# Altium PCB FullSheetOLD.PcbDoc (part 2 of 8)
Units mm, origin at the board's own origin, x right, y up, seen from the top; angles counter-clockwise.
Board outline 132.46 x 194.44 mm, 4 copper layers (Top Copper, L2_GND, L3_PWR_SIG, Bottom Copper), stack 1.586 mm thick; 495 components, 210 nets, 2171 pads, 1027 vias.
Unrouted connection lines stored in the file: 53.
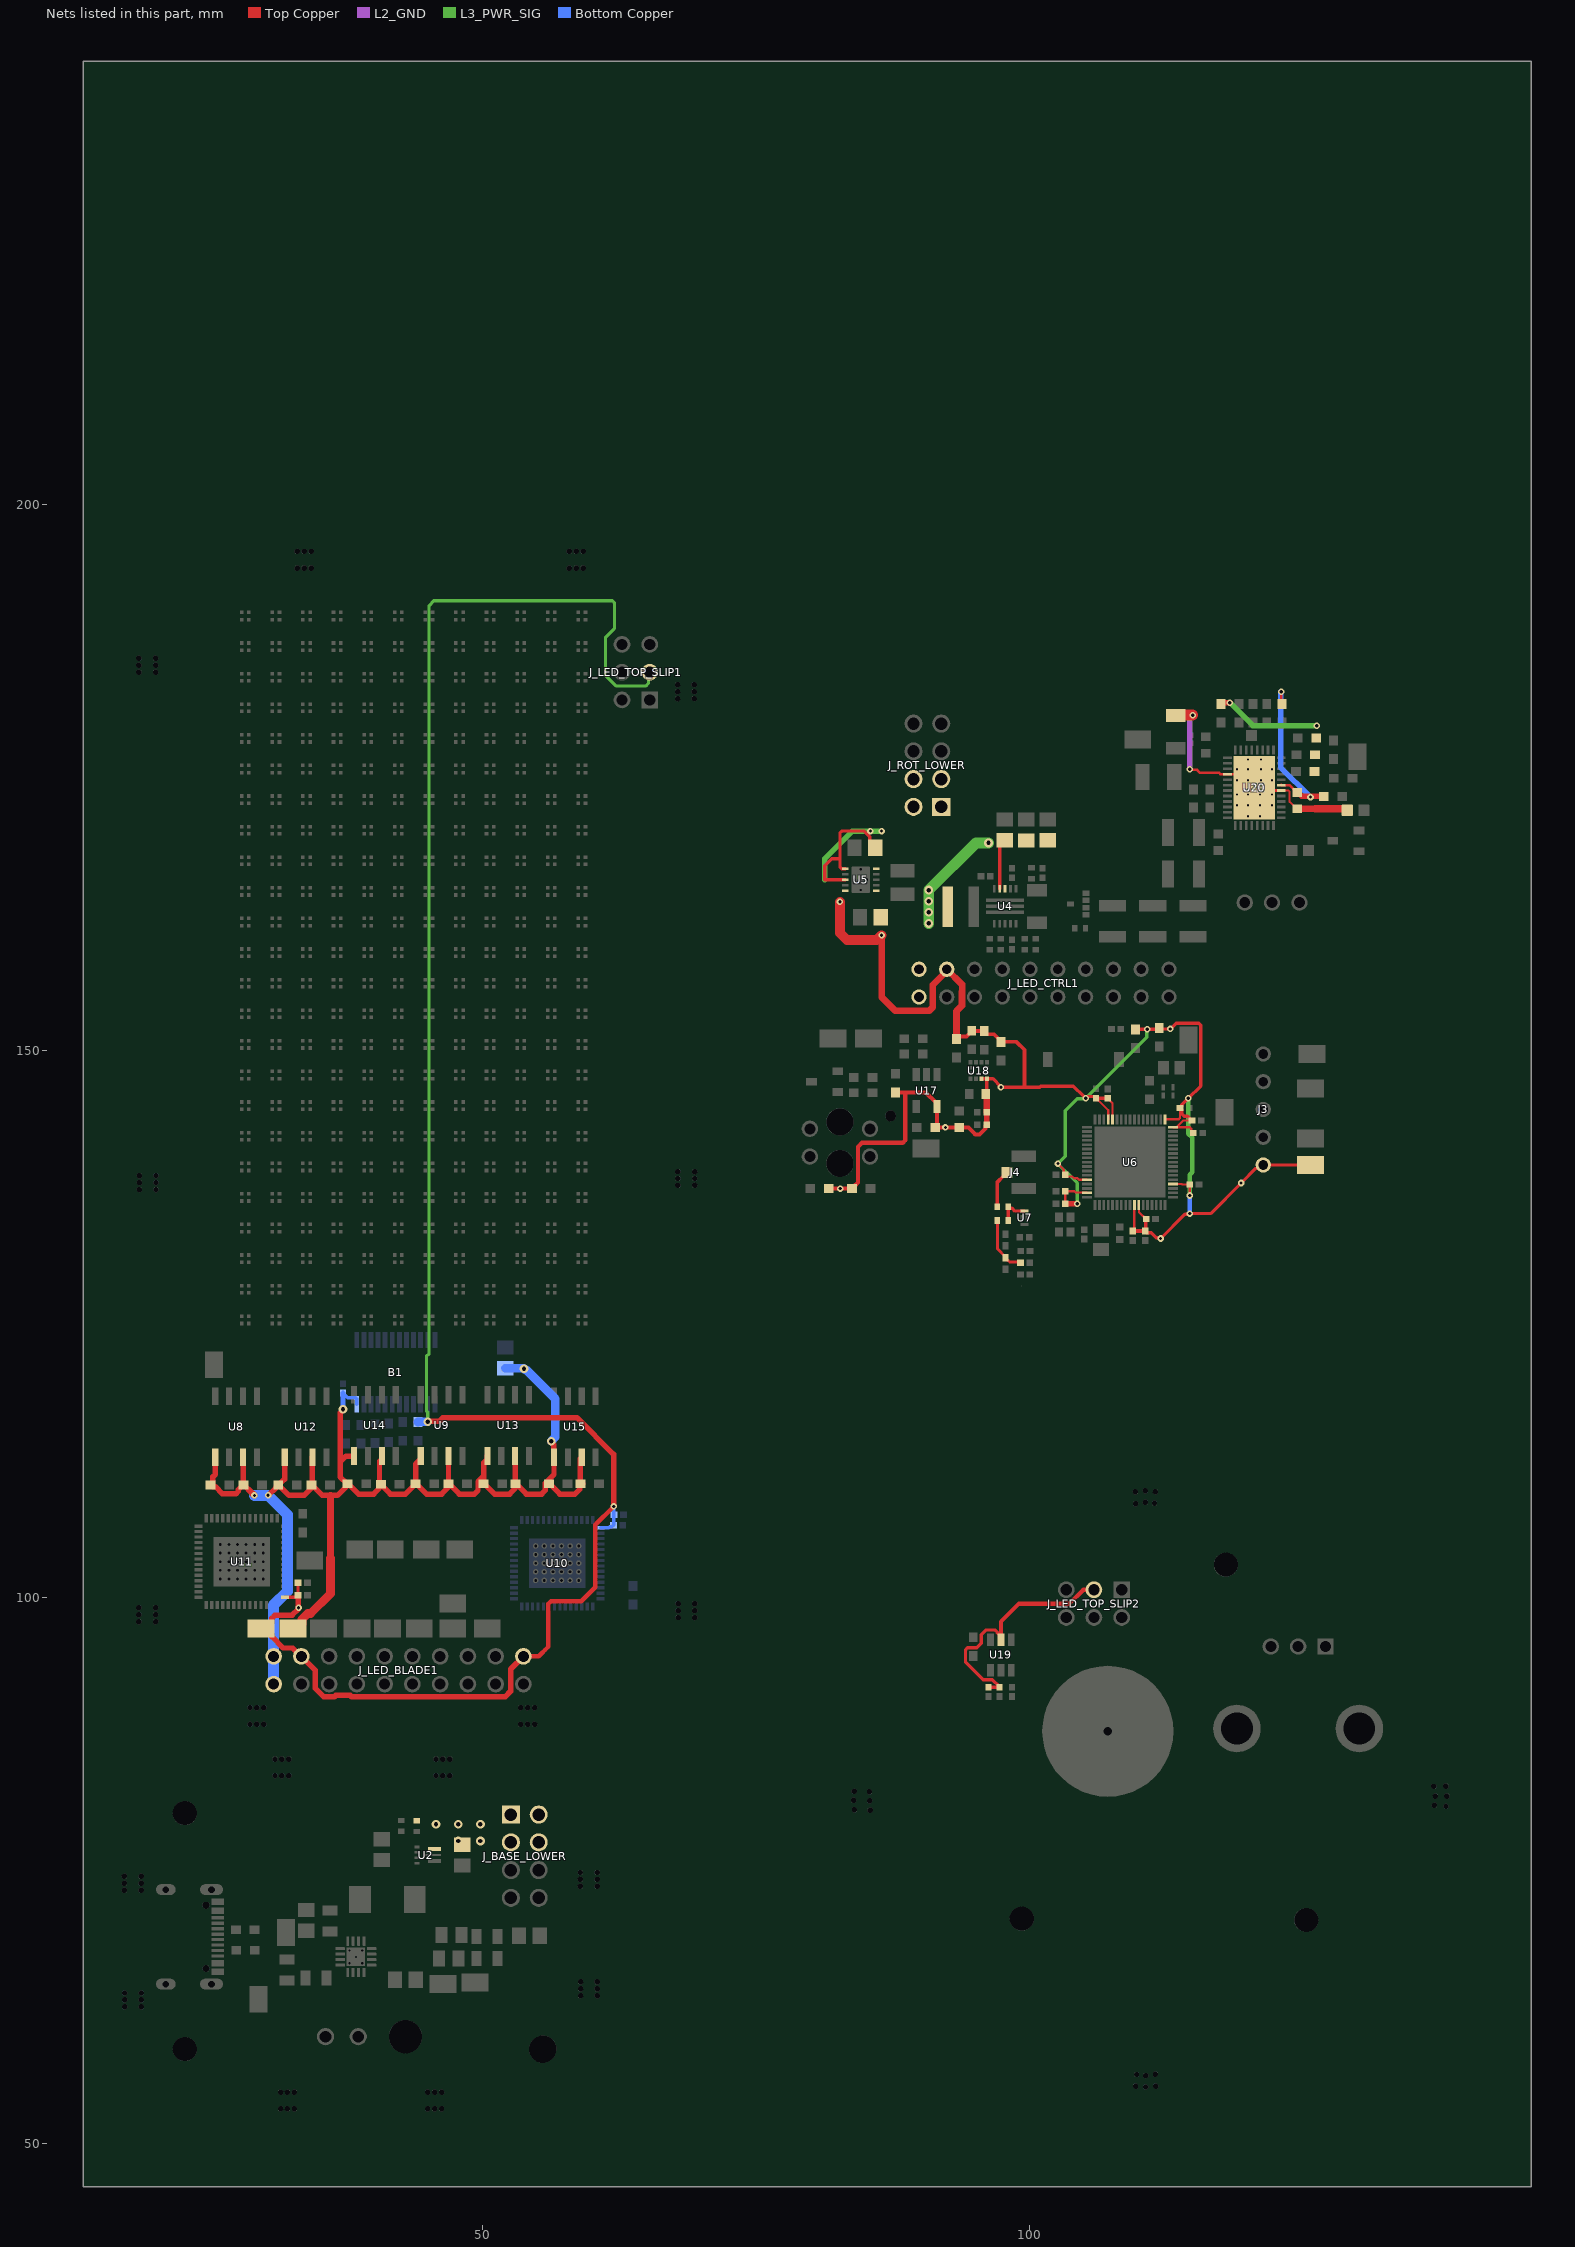
[diagram p4: the nets of this part, all layers, seen from the top]

## Footprints (in the part's own frame and the unit in brackets; to place one, negate y for a bottom-side part, rotate by r counter-clockwise, add the part's x,y. Pads: shape width x height; smd on the part's side, far side on the other; paste and mask are expansions set on the pad) (continued)
EC12E24204A2 [mm]
  round 4.35 hole 2.9: 1(-3.1,7.5) 2(8.1,7.5)
  rect 1.5x1.5 hole 1: A1(0,0)
  round 1.5 hole 1: B1(5,0) C1(2.5,0)
  silkscreen extent -3.7,-1.3 8.7,14.1
FP-AC0402-IPC_B [mm]
  rect 0.615x0.572 smd paste+0 mask+0: 1(-0.429,0) 2(0.429,0)
  body extent -0.89,-0.44 0.89,0.44, height 0.25
FP-AC0402-MFG [mm]
  rect 0.5x0.6 smd paste+0 mask+0: 1(-0.5,0) 2(0.5,0)
  body extent -0.85,-0.4 0.85,0.4, height 0.25
FP-AC0603-MFG [mm]
  rect 0.9x0.8 smd paste+0 mask+0: 1(-0.85,0) 2(0.85,0)
  body extent -0.8,-0.4 0.8,0.4, height 0.55
FP-CC0603-DA-MFG [mm]
  rect 0.8x0.9 smd paste+0 mask+0: 1(-0.75,0) 2(0.75,0)
  body extent -1.35,-0.75 1.35,0.75, height 0.25
G-32_MUR [mil]
  rect 42x98 smd paste+0 mask+0: 1(-56,0) 2(56,0)
  silkscreen extent -23,-54 23,54
G-033_MUR [mil]
  rect 21.78x12 smd paste+0 mask+0: 1(-14.89,0) 2(14.89,0)
  silkscreen extent -62,-3 -56,3, body extent -12,-6 12,6, height 13
GCT_USB4105-GF-A [mm]
  rect 0.6x1.15 smd mask+0.05: A1_B12(-3.2,4.755) A4_B9(-2.4,4.755) B1_A12(3.2,4.755) B4_A9(2.4,4.755)
  rect 0.3x1.15 smd mask+0.05: A5(-1.25,4.755) A6(-0.25,4.755) A7(0.25,4.755) A8(1.25,4.755) B5(1.75,4.755) B6(0.75,4.755) B7(-0.75,4.755) B8(-1.75,4.755)
  oval 1x2.1 hole 0.6 slot 1.7 at 90 deg: SH1(-4.32,4.18) SH2(4.32,4.18)
  oval 1x1.8 hole 0.6 slot 1.4 at 90 deg: SH3(-4.32,0) SH4(4.32,0)
  round 0.65 hole 0.65 unplated: ""(-2.89,3.68) ""(2.89,3.68)
  silkscreen extent -4.47,-2.6 4.47,6.1
IC_DMP3028LSD-13_DIO-M [mm]
  rect 1.628x0.559 smd paste+0 mask+0: 1(-2.795,1.905) 2(-2.795,0.635) 3(-2.795,-0.635) 4(-2.795,-1.905) 5(2.795,-1.905) 6(2.795,-0.635) 7(2.795,0.635) 8(2.795,1.905)
  silkscreen extent -2.11,-2.6 2.11,2.6, body extent -3.05,-2.48 3.05,2.48, height 1.76
IND_ASPI-0530HI-1R0M-T2 [mm]
  rect 2x2.5 smd: 1(-2.5,0) 2(2.5,0)
  silkscreen extent -2.85,-2.65 2.85,2.65, body extent -2.8,-2.6 2.8,2.6, height 1.45
IND_LQG15_MUR [mil]
  rect 28x22 smd paste+0 mask+0: 1(-20.5,0) 2(20.5,0)
  silkscreen extent -70,-3 -65,3, body extent -21,-11 21,11, height 22
IND_LQG15W_MUR [mil]
  rect 24x26 smd paste+0 mask+0: 1(-22.5,0) 2(22.5,0)
  Top Copper keep-out region: -3.94,-11 -3.94,11 3.94,11 3.94,-11
  Keep-Out Layer region: -3.94,-11.81 -3.94,11.81 3.94,11.81 3.94,-11.81
  body extent -21,-13 21,13, height 24
IND_LQH44PN_PR_MUR [mil]
  rect 51x94 smd paste+0 mask+0: 1(-57,0) 2(57,0)
  silkscreen extent -131,-88 88,88, body extent -83,-83 83,83, height 71
"IND_LQM21FN100M80L_MUR - duplicate" [mil]
  rect 45.78x57 smd paste+0 mask+0: 1(-34.39,0) 2(34.39,0)
  silkscreen extent -93,-3 -87,3, body extent -44,-29 44,29, height 57
INDC2520X100N [mm]
  rect 1.24x2.22 smd: 1(-1.09,0) 2(1.09,0)
  silkscreen extent -0.15,-1.1 0.15,1.1
LEDC2012X120N [mm]
  rect 1.1x1.45 smd: A(0.9,0) C(-0.9,0)
  silkscreen extent -2.1,-0.6 0.2,0.6, body extent -1,-0.65 1,0.65, height 0.9
LGA12R50P4X4_200X200X70 [mm]
  rect 0.4x0.35 smd: 1(-0.76,0.75) 2(-0.76,0.25) 3(-0.76,-0.25) 4(-0.76,-0.75) 7(0.76,-0.75) 8(0.76,-0.25) 9(0.76,0.25) 10(0.76,0.75)
  rect 0.35x0.4 smd: 5(-0.25,-0.76) 6(0.25,-0.76) 11(0.25,0.76) 12(-0.25,0.76)
  silkscreen extent -1.55,-1.05 1.05,1.05
NX2016SA_NDK [mil]
  rect 30x33 smd paste+0 mask+0: 1(-20.67,26.57) 2(-20.67,-26.57) 3(20.67,-26.57) 4(20.67,26.57)
  silkscreen extent -86,22 -76,32, body extent -34,-41 34,41, height 20
OPTO_TCRT5000 [mm]
  round 1.5 hole 1: A(2.75,1.27) CATH(2.75,-1.27) COLL(-2.75,1.27) E(-2.75,-1.27)
  round 1 hole 1 unplated: ""(-4.65,-2.45)
  round 2.5 hole 2.5 unplated: ""(0,1.9) ""(0,-1.9)
  silkscreen extent -5.15,-2.95 5.15,2.95
QFN50P300X300X100-17N [mm]
  rrect25% 0.86x0.26 smd: 1(-1.435,0.75) 2(-1.435,0.25) 3(-1.435,-0.25) 4(-1.435,-0.75) 9(1.435,-0.75) 10(1.435,-0.25) 11(1.435,0.25) 12(1.435,0.75)
  rrect25% 0.26x0.86 smd: 5(-0.75,-1.435) 6(-0.25,-1.435) 7(0.25,-1.435) 8(0.75,-1.435) 13(0.75,1.435) 14(0.25,1.435) 15(-0.25,1.435) 16(-0.75,1.435)
  round 0.4 hole 0.2 mask+0: 17(-0.58,-0.58) 17(-0.58,0.58) 17(0,0) 17(0.58,-0.58) 17(0.58,0.58)
  rect 1.68x1.68 smd paste-0.31: 17(0,0)
  silkscreen extent -2.57,-1.5 1.5,1.5, body extent -1.5,-1.5 1.5,1.5, height 1
RESC2012X60N [mm]
  rect 0.92x1.38 smd: 1(-0.955,0) 2(0.955,0)
  silkscreen extent -0.17,-0.68 0.17,0.68, body extent -1,-0.63 1,0.63, height 0.6
RGF0040E-IPC_B [mm]
  rect 0.806x0.242 smd paste+0 mask+0: 1(-2.453,2.75) 2(-2.453,2.25) 3(-2.453,1.75) 4(-2.453,1.25) 5(-2.453,0.75) 6(-2.453,0.25) 7(-2.453,-0.25) 8(-2.453,-0.75) 9(-2.453,-1.25) 10(-2.453,-1.75) 11(-2.453,-2.25) 12(-2.453,-2.75) 21(2.453,-2.75) 22(2.453,-2.25) 23(2.453,-1.75) 24(2.453,-1.25) 25(2.453,-0.75) 26(2.453,-0.25) 27(2.453,0.25) 28(2.453,0.75) 29(2.453,1.25) 30(2.453,1.75) 31(2.453,2.25) 32(2.453,2.75)
  rect 0.242x0.806 smd paste+0 mask+0: 13(-1.75,-3.453) 14(-1.25,-3.453) 15(-0.75,-3.453) 16(-0.25,-3.453) 17(0.25,-3.453) 18(0.75,-3.453) 19(1.25,-3.453) 20(1.75,-3.453) 33(1.75,3.453) 34(1.25,3.453) 35(0.75,3.453) 36(0.25,3.453) 37(-0.25,3.453) 38(-0.75,3.453) 39(-1.25,3.453) 40(-1.75,3.453)
  rect 3.8x5.8 smd paste-2.887 mask+0: 41(0,0)
  silkscreen extent -3.53,-3.5 2.5,3.5
RNW0013A [mm]
  rect 0.7x0.25 smd paste+0 mask+0.051: 1(-1.6,1) 2(-1.6,0.5) 3(-1.6,0) 4(-1.6,-0.5) 5(-1.6,-1) 9(1.6,-1) 10(1.6,-0.5) 11(1.6,0) 12(1.6,0.5) 13(1.6,1)
  rect 0.35x3.5 smd paste-1.737 mask-0.051: 6(-0.55,0) 7(0,0) 8(0.55,0)
  silkscreen extent -1.9,-1.65 1.9,1.65
RTQ56_4P5X5P2_TEX [mil]
  rect 29.69x11.81 smd paste-5.91 mask+0: 1(-155.93,127.95) 2(-155.93,108.27) 3(-155.93,88.58) 4(-155.93,68.9) 5(-155.93,49.21) 6(-155.93,29.53) 7(-155.93,9.84) 8(-155.93,-9.84) 9(-155.93,-29.53) 10(-155.93,-49.21) 11(-155.93,-68.9) 12(-155.93,-88.58) 13(-155.93,-108.27) 14(-155.93,-127.95) 29(155.94,-127.95) 30(155.94,-108.27) 31(155.94,-88.58) 32(155.94,-68.9) 33(155.94,-49.21) 34(155.94,-29.53) 35(155.94,-9.84) 36(155.94,9.84) 37(155.94,29.53) 38(155.94,49.21) 39(155.94,68.9) 40(155.94,88.58) 41(155.94,108.27) 42(155.94,127.95)
  rect 11.81x29.69 smd paste-5.91 mask+0: 15(-127.99,-155.93) 16(-108.3,-155.93) 17(-88.61,-155.93) 18(-68.91,-155.93) 19(-49.22,-155.93) 20(-29.53,-155.93) 21(-9.84,-155.93) 22(9.84,-155.93) 23(29.53,-155.93) 24(49.23,-155.93) 25(68.91,-155.93) 26(88.6,-155.93) 27(108.3,-155.93) 28(127.98,-155.93) 43(127.98,155.93) 44(108.3,155.93) 45(88.6,155.93) 46(68.91,155.93) 47(49.23,155.93) 48(29.53,155.93) 49(9.84,155.93) 50(-9.84,155.93) 51(-29.53,155.93) 52(-49.22,155.93) 53(-68.91,155.93) 54(-88.61,155.93) 55(-108.3,155.93) 56(-127.99,155.93)
  round 20 hole 10 paste-99999 mask-10: 57(-62,-77.5) 57(-62,-46.5) 57(-62,-15.5) 57(-62,15.5) 57(-62,46.5) 57(-62,77.5) 57(-31,-77.5) 57(-31,-46.5) 57(-31,-15.5) 57(-31,15.5) 57(-31,46.5) 57(-31,77.5) 57(0,-77.5) 57(0,-46.5) 57(0,-15.5) 57(0,15.5) 57(0,46.5) 57(0,77.5) 57(31,-77.5) 57(31,-46.5) 57(31,-15.5) 57(31,15.5) 57(31,46.5) 57(31,77.5) 57(62,-77.5) 57(62,-46.5) 57(62,-15.5) 57(62,15.5) 57(62,46.5) 57(62,77.5)
  rect 177.17x204.72 smd paste-101.86 mask-102: 57(0,0)
  silkscreen extent -191,-191 191,191, body extent -162,-162 162,162, height 29
SMD4_UHD111A-FKA_CRW [mm]
  rect 0.33x0.33 smd paste+0 mask+0: 1(-0.33,0.33) 2(-0.33,-0.33) 3(0.33,-0.33) 4(0.33,0.33)
SOP65P640X110-24N [mm]
  rect 1.475x0.45 smd: 1(-2.938,3.575) 2(-2.938,2.925) 3(-2.938,2.275) 4(-2.938,1.625) 5(-2.938,0.975) 6(-2.938,0.325) 7(-2.938,-0.325) 8(-2.938,-0.975) 9(-2.938,-1.625) 10(-2.938,-2.275) 11(-2.938,-2.925) 12(-2.938,-3.575) 13(2.938,-3.575) 14(2.938,-2.925) 15(2.938,-2.275) 16(2.938,-1.625) 17(2.938,-0.975) 18(2.938,-0.325) 19(2.938,0.325) 20(2.938,0.975) 21(2.938,1.625) 22(2.938,2.275) 23(2.938,2.925) 24(2.938,3.575)
  silkscreen extent -3.67,-3.9 1.85,4.15
SOT23-6 [mil]
  rect 24x45 smd: 1(-37.4,-55.28) 2(0,-55.28) 3(37.4,-55.28) 4(37.4,55.28) 5(0,55.28) 6(-37.4,55.28)
  silkscreen extent -57,-31 57,31, body extent -56,-57 56,57, height 50
SOT95P240X120-3N [mm]
  rect 1x0.7 smd: 1(-1.2,0.95) 2(-1.2,-0.95) 3(1.2,0)
  silkscreen extent -1.7,-1.46 0.35,1.55
SW_PTS636S-J_CNK [mil]
  rect 35x55 smd paste+0 mask+0: 1(-127.95,0) 2(127.95,0)
  silkscreen extent -172,-74 123,74, body extent -118,-69 118,69, height 159
Touch_Pad_Surface [mm]
  round 12 hole 0.762 paste-6.1 mask-6.1: 1(0,0)
  round 16 on Mech15: ""(0,0)
  round 12 on Mech13: ""(0,0)
TP1x1mm [mm]
  rect 1x1 smd: 1(0,0)
TP+245X165 [mm]
  rect 2.45x1.65 smd: 1(0,0)
  body extent -1,-0.63 1,0.63, height 0.84
TRANS_CSD17308Q3 [mm]
  rect 0.63x0.5 smd paste-0.09: 1(-1.435,0.975) 2(-1.435,0.325) 3(-1.435,-0.325) 4(-1.435,-0.975)
  rect 0.63x0.5 smd paste-1 mask+0: 5(0,0) 6(0,0) 7(0,0) 8(0,0)
  Top Copper region: 1.75,0.725 1.34,0.725 1.34,0.575 1.75,0.575 1.75,0.075 1.34,0.075 1.34,-0.075 1.75,-0.075 1.75,-0.575 1.34,-0.575 1.34,-0.725 1.75,-0.725 1.75,-1.225 -0.56,-1.225 -0.56,1.225 1.75,1.225
  silkscreen extent -2.45,-1.65 1.65,1.65, body extent -1.65,-1.65 1.65,1.65, height 1.1
TSW-104-07-G-D_SAI [mil]
  rect 65x65 / inner round 60 / far side rect 65x65 hole 45 paste-99999 mask+0: 1(0,0)
  round 65 / inner round 60 / far side round 65 hole 45 paste-99999 mask+0: 2(0,100) 3(100,0) 4(100,100) 5(200,0) 6(200,100) 7(300,0) 8(300,100)
  silkscreen extent -55,-93 355,155
VFQFN68-8x8mm [mil]
  rect 36x10 smd paste+0 mask+0: 1(-154.5,125.98) 2(-154.5,110.24) 3(-154.5,94.49) 4(-154.5,78.74) 5(-154.5,62.99) 6(-154.5,47.24) 7(-154.5,31.5) 8(-154.5,15.75) 9(-154.5,0) 10(-154.5,-15.75) 11(-154.5,-31.5) 12(-154.5,-47.24) 13(-154.5,-62.99) 14(-154.5,-78.74) 15(-154.5,-94.49) 16(-154.5,-110.24) 17(-154.5,-125.98) 35(154.5,-125.98) 36(154.5,-110.24) 37(154.5,-94.49) 38(154.5,-78.74) 39(154.5,-62.99) 40(154.5,-47.24) 41(154.5,-31.5) 42(154.5,-15.75) 43(154.5,0) 44(154.5,15.75) 45(154.5,31.5) 46(154.5,47.24) 47(154.5,62.99) 48(154.5,78.74) 49(154.5,94.49) 50(154.5,110.24) 51(154.5,125.98)
  rect 10x36 smd paste+0 mask+0: 18(-125.98,-154.5) 19(-110.24,-154.5) 20(-94.49,-154.5) 21(-78.74,-154.5) 22(-62.99,-154.5) 23(-47.24,-154.5) 24(-31.5,-154.5) 25(-15.75,-154.5) 26(0,-154.5) 27(15.75,-154.5) 28(31.5,-154.5) 29(47.24,-154.5) 30(62.99,-154.5) 31(78.74,-154.5) 32(94.49,-154.5) 33(110.24,-154.5) 34(125.98,-154.5) 52(125.98,154.5) 53(110.24,154.5) 54(94.49,154.5) 55(78.74,154.5) 56(62.99,154.5) 57(47.24,154.5) 58(31.5,154.5) 59(15.75,154.5) 60(0,154.5) 61(-15.75,154.5) 62(-31.5,154.5) 63(-47.24,154.5) 64(-62.99,154.5) 65(-78.74,154.5) 66(-94.49,154.5) 67(-110.24,154.5) 68(-125.98,154.5)
  rect 256x256 smd paste-128 mask+0: 69(0,0)
  silkscreen extent -192,-193 192,192, body extent -161,-161 161,161, height 39
VREG_V62/16624-01YE [mm]
  rrect25% 0.6x0.24 smd mask+0: 1(-1.4,1) 2(-1.4,0.5) 3(-1.4,0) 4(-1.4,-0.5) 5(-1.4,-1) 6(1.4,-1) 7(1.4,-0.5) 8(1.4,0) 9(1.4,0.5) 10(1.4,1)
  round 0.3 hole 0.2 mask+0: 11(-0.575,0) 11(0,0.95) 11(0,-0.95) 11(0.575,0)
  rrect5% 1.65x2.4 smd paste-2 mask+0: 11(0,0)
  Top Copper region: 0.375,1.2 0.825,1.2 0.825,-1.2 0.375,-1.2 0.375,-1.7 0.125,-1.7 0.125,-1.2 -0.125,-1.2 -0.125,-1.7 -0.375,-1.7 -0.375,-1.2 -0.825,-1.2 -0.825,1.2 -0.375,1.2 -0.375,1.7 -0.125,1.7 -0.125,1.2 0.125,1.2 0.125,1.7 0.375,1.7
  silkscreen extent -2.49,-1.5 1.5,1.5, body extent -1.5,-1.5 1.5,1.5, height 1
WE-MXGI_4020 [mm] "SMT Power Inductor, body 4.10 x 4.10 mm"
  rect 0.98x3.7 smd: 1(-1.185,0) 2(1.185,0)
  Top Copper keep-out region: -0.695,2.05 0.695,2.05 0.695,-2.05 -0.695,-2.05
  silkscreen extent -2.15,-2.15 2.15,2.77, body extent -2.05,-2.05 2.05,2.05, height 2.15
XTAL_NDK_NX2012SA_2P05X1P20 [mm]
  rect 1x1.25 smd: 1(-0.75,0) 2(0.75,0)
  silkscreen extent -0.75,-0.75 0.75,0.75

## Part data
B1: "74HC(T)154 - 4-to-16 line decoder/demultiplexer@en-us", Manufacturer_Name=Nexperia, Manufacturer_Part_Number=74HCT154PW,118, Mouser Part Number=771-HCT154PW118, Datasheet Link=https://assets.nexperia.com/documents/data-sheet/74HC_HCT154.pdf, Geometry.Height=1.1mm, Mouser Price/Stock=https://www.mouser.co.uk/ProductDetail/Nexperia/74HCT154PW118?qs=P62ublwmbi%2FnODHcqEFOBg%3D%3D
C1: library part CAPACITOR_0805, "Generic ceramic capacitor, 0805 / 2012 metric", Manufacturer=KEMET, Manufacturer Part Number=C0805X105K8RACTU, Package=0805
C2 C3: library part CAPACITOR_0805, "Generic ceramic capacitor, 0805 / 2012 metric", Manufacturer=TDK, Manufacturer Part Number=CGA4J3X7R1A475K125AB, Package=0805
C4: library part CAPACITOR_0805, "Generic ceramic capacitor, 0805 / 2012", Manufacturer=Kemet, Manufacturer Part Number=C0805C106K8PACTU, Package=0805
C5: library part CAPACITOR_0805, "Generic ceramic capacitor, 0805 / 2012", Manufacturer="Taiyo Yuden", Manufacturer Part Number=MSAST21GBB5106MTNA01, Package=0805
C6: library part CAPACITOR_0402, "Generic ceramic capacitor, 0402 / 1005", Manufacturer=Murata, Manufacturer Part Number=GRM155R71C104KA88J, Package=0402
C7: library part CAPACITOR_1206, "Generic ceramic capacitor, 1206", Manufacturer=TDK, Manufacturer Part Number=C3216X7R1E475K160AC, Package=1206
C8: library part CAPACITOR_0402, "Generic ceramic capacitor, 0402 / 1005", Manufacturer=Murata, Manufacturer Part Number=GRM155R71E223KA61D, Package=0402
C9 C10 C11: library part CAPACITOR_0805, "Generic ceramic capacitor, 0805 / 2012", Manufacturer=Murata, Manufacturer Part Number=GRM21BR61A226ME44L, Package=0805
C12: library part CAPACITOR_0402, "Generic ceramic capacitor, 0402 / 1005", Manufacturer=Murata, Manufacturer Part Number=GRM155R61A475ME01D, Package=0402
C13 C14 C15: library part CAPACITOR_1210, "Generic ceramic capacitor, 1210", Manufacturer=TDK, Manufacturer Part Number=C3225X7R1E226M250AB, Package=1210
C16: library part CAPACITOR_0402, "Generic ceramic capacitor, 0402 / 1005", Manufacturer=Murata, Manufacturer Part Number=GRM1555C1H102JA01J, Package=0402
C17: library part CAPACITOR_0805, "Generic ceramic capacitor, 0805 / 2012", Manufacturer="Taiyo Yuden", Manufacturer Part Number=MSASE21GAB5106KTNA01, Package=0805
C18 C43: library part CAPACITOR_0805, "Generic ceramic capacitor, 0805 / 2012", Manufacturer=TDK, Manufacturer Part Number=C2012X5R1A476M125AC, Package=0805
C19 C21 C22 C23 C27 C29 C32 C33 C40 C41 C44 C47 C48 C51: library part CAPACITOR_0402, "Generic ceramic capacitor, 0402 / 1005", Manufacturer=Murata, Manufacturer Part Number=GRM155R61H104KE19D, Package=0402
C20 C28 C34 C39 C42: library part CAPACITOR_0402, "Generic ceramic capacitor, 0402 / 1005", Manufacturer=Murata, Manufacturer Part Number=GRM155R61A475MEADD, Package=0402
C24: library part CAPACITOR_0402, "Generic ceramic capacitor, 0402 / 1005", Manufacturer="Kyocera AVX", Manufacturer Part Number=0402YD103KAT2A, Package=0402
C25 C50: library part CAPACITOR_0402, "Generic ceramic capacitor, 0402 / 1005", Manufacturer=Murata, Manufacturer Part Number=GRM155R61E105KA12D, Package=0402
C26: library part CAPACITOR_0402, "Generic ceramic capacitor, 0402 / 1005", Manufacturer=Yageo, Manufacturer Part Number=CC0402KRX7R9BB101, Package=0402
C30 C31: library part GRM0335C1E100JA01D, "10 pF Capacitor", Manufacturer_Name=Murata, Copyright="Copyright (C) 2025 Ultra Librarian. All rights reserved.", Manufacturer_Part_Number=GRM0335C1E100JA01D, RefDes=RefDes, Type=Type
C35: library part CAPACITOR_0402, "Generic ceramic capacitor, 0402 / 1005", Manufacturer=Murata, Manufacturer Part Number=GJM1555C1HR80WB01D, Package=0402
C36: library part CAPACITOR_0402, "Generic ceramic capacitor, 0402 / 1005", Manufacturer=Murata, Manufacturer Part Number=GJM1555C1HR30WB01D, Package=0402
C37_DNP C38_DNP: library part CAPACITOR_0402, "Generic ceramic capacitor, 0402 / 1005", Package=0402, DNP=Yes
C45: library part CAPACITOR_0603, "Generic ceramic capacitor, 0603", Manufacturer=Yageo, Manufacturer Part Number=CC0603KRX7R7BB104, Package=0603
C46: library part CAPACITOR_0603, "Generic ceramic capacitor, 0603", Manufacturer=Murata, Manufacturer Part Number=GRM188R60J106ME47D, Package=0603
C49: library part CAPACITOR_0402, "Generic ceramic capacitor, 0402 / 1005", Manufacturer=Murata, Manufacturer Part Number=GRM1555C1H100JA01D, Package=0402
C52: library part CAPACITOR_0603, "Generic ceramic capacitor, 0603", Manufacturer="Würth Elektronik", Manufacturer Part Number=885012206095, Package=0603
C53 C_VM_BK1: library part GRM32ER71E226KE15L, "CAP, CERM, 22 uF, 25 V, +/- 10%, X7R, 1210", Manufacturer_Name=Murata, Copyright="Copyright (C) 2025 Ultra Librarian. All rights reserved.", Manufacturer_Part_Number=GRM32ER71E226KE15L
C54 C56 C57: library part CAPACITOR_0603, "Generic ceramic capacitor, 0603", Manufacturer=KEMET, Manufacturer Part Number=C0603C105K4RACTU, Package=0603
C55: library part CAPACITOR_0603, "Generic ceramic capacitor, 0603", Manufacturer="Würth Elektronik", Manufacturer Part Number=885012206093, Package=0603
C_bk1: library part CAPACITOR_1206, "Generic ceramic capacitor, 1206", Manufacturer=Murata, Manufacturer Part Number=GRM31CR71A226KE15L, Package=1206
D1: library part LED_0805, "Generic indicator LED, 0805 / 2012 metric", Manufacturer="Würth Elektronik", Manufacturer Part Number=150080RS75000, Package=0805
D2: library part LED_0805, "Generic indicator LED, 0805 / 2012 metric", Manufacturer="Würth Elektronik", Manufacturer Part Number=150080VS75000, Package=0805
E1: "12 mm PAD"
J1: "Micro-Fit 3.0 Right-Angle Header, 3.00mm Pitch, Dual Row, 2 Circuits, with Snap-in Plastic Peg PCB Lock, Tin, Glow-Wire Capable, Black", Manufacturer_Name="Molex Connector Corporation", Copyright="Copyright (C) 2026 Ultra Librarian. All rights reserved.", Manufacturer_Part_Number=430450200, RefDes=RefDes, Type=Type
J3: "CONN HEADER VERT 5POS 2.54MM", Manufacturer_Name="Samtec Inc", Copyright="Copyright (C) 2026 Ultra Librarian. All rights reserved.", Manufacturer_Part_Number=TSW-105-23-S-S, RefDes=RefDes, Type=Type
J4: library part U.FL-R-SMT-101, "U.FL (UMCC) Connector Receptacle, Male Pin 50 Ohms Surface Mount Solder", Manufacturer_Name=Hirose, Copyright="Copyright (C) 2025 Ultra Librarian. All rights reserved.", Manufacturer_Part_Number=U.FL-R-SMT-1(01), RefDes=RefDes, Type="Coaxial Connectors(RF) Assemblies"
J5: Package=None, Availability=Unavailable, MF="{'manufacturer': u'GCT'}", MP=USB4105-GF-A, Price=None
J6: "CONN HEADER VERT 3POS 2.5MM", Manufacturer_Name=JST, Copyright="Copyright (C) 2026 Ultra Librarian. All rights reserved.", Manufacturer_Part_Number=B3B-XH-A, RefDes=RefDes, Type=Type
J8 J9 J10: library part 2way, ComponentLink1Description=Source, ComponentLink1URL=http://www.edatools.cz/addons, FootprintNote="LP=12mil, MP=40mil, HP=120mil"
J_BASE_LOWER J_ROT_LOWER: "8 wire slip ring"
J_LED_BLADE1: "20 Pin Female Connector", Manufacturer_Name="Samtec Inc", Copyright="Copyright (C) 2026 Ultra Librarian. All rights reserved.", Manufacturer_Part_Number=SSW-110-01-T-D, RefDes=RefDes, Type=Type
J_LED_CTRL1: "20 Pin Male connector", Manufacturer_Name="Samtec Inc", Copyright="Copyright (C) 2026 Ultra Librarian. All rights reserved.", Manufacturer_Part_Number=TSW-110-08-L-D-RA, RefDes=RefDes, Type=Type
J_LED_TOP_SLIP1 J_LED_TOP_SLIP2: "Through Hole, Double Row, 6 Positions, 2.54 mm (0.100in) Pitch, EconoStikâ„¢, Board to Board connector, Unshrouded Vertical Header,.", Package=None, Availability="In Stock", Check_prices=https://www.snapeda.com/parts/10129381-906002BLF/Amphenol+FCI/view-part/?ref=eda, MF="Amphenol ICC (FCI)", MP=10129381-906002BLF, Price=None, Purchase-URL=https://pricing.snapeda.com/search/part/10129381-906002BLF/?ref=eda, SnapEDA_Link=https://www.snapeda.com/parts/10129381-906002BLF/Amphenol+FCI/view-part/?ref=snap
L1: "1 ÂµH Shielded Molded Inductor 7 A 14mOhm Max Nonstandard", Package="Nonstandard Abracon LLC", Availability="In Stock", Check_prices=https://www.snapeda.com/parts/ASPI-0530HI-1R0M-T2/Abracon+LLC/view-part/?ref=eda, MF="Abracon LLC", MP=ASPI-0530HI-1R0M-T2, Price=None, Purchase-URL=https://pricing.snapeda.com/search/part/ASPI-0530HI-1R0M-T2/?ref=eda, SnapEDA_Link=https://www.snapeda.com/parts/ASPI-0530HI-1R0M-T2/Abracon+LLC/view-part/?ref=snap
L2: "1 ÂµH Shielded Molded Inductor 12.1 A 7.9mOhm Max Nonstandard", Package=None, Availability=Unavailable, Check_prices=https://www.snapeda.com/parts/7443844020010/Wurth+Electronics/view-part/?ref=eda, MF="Wurth Elektronik", MP=7443844020010, Price=None, SnapEDA_Link=https://www.snapeda.com/parts/7443844020010/Wurth+Electronics/view-part/?ref=snap
L3: "INDUCTOR, 1.5UH, 20%, 1.5A, 50MHZ, 1008", Package=None, Availability=Unavailable, MP=LQM2HPN1R5MG0L, Price=None
L4: library part INDUCTOR_0402, "Generic SMD inductor, 0402", Manufacturer=Murata, Manufacturer Part Number=LQG15WZ10NJ02D, Package=0402
L5: library part INDUCTOR_0805, "Generic SMD inductor, 0805 / 2012 metric", Manufacturer=Murata, Manufacturer Part Number=LQM21FN100M80L, Package=0805
L6: library part INDUCTOR_0402, "Generic SMD inductor, 0402", Manufacturer=Murata, Manufacturer Part Number=LQG15HS2N7S02D, Package=0402
L7: library part INDUCTOR_0402, "Generic SMD inductor, 0402", Package=0402
L8: "47 µH shielded buck inductor, 600 mA", Manufacturer_Name=Murata, Copyright="Copyright (C) 2025 Ultra Librarian. All rights reserved.", Manufacturer_Part_Number=LQH44PN470MPRL
LED1 LED2 LED3 LED4 LED5 LED6 LED7 LED8 LED9 LED10 LED11 LED12 LED13 LED14 LED15 LED16 LED17 LED18 LED19 LED20 LED21 LED22 LED23 LED24 LED25 LED26 LED27 LED28 LED29 LED30 LED31 LED32 LED33 LED34 LED35 LED36 LED37 LED38 LED39 LED40 LED41 LED42 LED43 LED44 LED45 LED46 LED47 LED48 LED49 LED50 LED51 LED52 LED53 LED54 LED55 LED56 LED57 LED58 LED59 LED60 LED61 LED62 LED63 LED64 LED65 LED66 LED67 LED68 LED69 LED70 LED71 LED72 LED73 LED74 LED75 LED76 LED77 LED78 LED79 LED80 LED81 LED82 LED83 LED84 LED85 LED86 LED87 LED88 LED89 LED90 LED91 LED92 LED93 LED94 LED95 LED96 LED97 LED98 LED99 LED100 LED101 LED102 LED103 LED104 LED105 LED106 LED107 LED108 LED109 LED110 LED111 LED112 LED113 LED114 LED115 LED116 LED117 LED118 LED119 LED120 LED121 LED122 LED123 LED124 LED125 LED126 LED127 LED128 LED129 LED130 LED131 LED132 LED133 LED134 LED135 LED136 LED137 LED138 LED139 LED140 LED141 LED142 LED143 LED144 LED145 LED146 LED147 LED148 LED149 LED150 LED151 LED152 LED153 LED154 LED155 LED156 LED157 LED158 LED159 LED160 LED161 LED162 LED163 LED164 LED165 LED166 LED167 LED168 LED169 LED170 LED171 LED172 LED173 LED174 LED175 LED176 LED177 LED178 LED179 LED180 LED181 LED182 LED183 LED184 LED185 LED186 LED187 LED188 LED189 LED190 LED191 LED192 LED193 LED194 LED195 LED196 LED197 LED198 LED199 LED200 LED201 LED202 LED203 LED204 LED205 LED206 LED207 LED208 LED209 LED210 LED211 LED212 LED213 LED214 LED215 LED216 LED217 LED218 LED219 LED220 LED221 LED222 LED223 LED224 LED225 LED226 LED227 LED228 LED229 LED230 LED231 LED232 LED233 LED234 LED235 LED236 LED237 LED238 LED239 LED240 LED241 LED242 LED243 LED244 LED245 LED246 LED247 LED248 LED249 LED250 LED251 LED252 LED253 LED254 LED255 LED256 LED257 LED258 LED259 LED260 LED261 LED262 LED263 LED264 LED265 LED266 LED267 LED268 LED269 LED270 LED271 LED272 LED273 LED274 LED275 LED276 LED277 LED278 LED279 LED280 LED281 LED282 LED283 LED284 LED285 LED286 LED287 LED288: "Description", Manufacturer_Name="Cree LED", Copyright="Copyright (C) 2025 Ultra Librarian. All rights reserved.", Manufacturer_Part_Number=UHD111A-FKA-C3K23E1L3VG5ZB3Z3, RefDes=RefDes, Type="LED Indication"
Q1 Q2: "Low RDS(on); Surface Mount Package; This is a Pb-Free Device; ESD Protected; RoHS Compliant", Manufacturer_Name=onsemi, Mouser Part Number=512-2N7002K, Datasheet Link=https://www.onsemi.com/pub/Collateral/2N7002K-FSC-D.PDF, Geometry.Height=1.2mm, Manufacturer_Part_Number=2N7002K, Mouser Price/Stock=https://www.mouser.co.uk/ProductDetail/onsemi-Fairchild/2N7002K?qs=iS%252BvaFGfLorx0keKeEIrfg%3D%3D
R1 R2: library part RESISTOR_0805, "Generic SMD resistor, 0805 / 2012 metric", Manufacturer=Yageo, Manufacturer Part Number=SR0805FR-471K5L, Package=0805
R3: library part RESISTOR_0805, "Generic SMD resistor, 0805 / 2012 metric", Manufacturer="Vishay Dale", Manufacturer Part Number=CRCW080510K0FKEA, Package=0805
R4: library part RESISTOR_0805, "Generic SMD resistor, 0805 / 2012 metric", Manufacturer=Vishay, Manufacturer Part Number=CRCW08053K01FKTA, Package=0805
R5: library part RESISTOR_0805, "Generic SMD resistor, 0805 / 2012 metric", Manufacturer=Vishay, Manufacturer Part Number=CRCW08052K49FKEA, Package=0805
R6: library part RESISTOR_0402, "Generic SMD resistor, 0402", Manufacturer=Vishay, Manufacturer Part Number=CRCW0402732KFKED, Package=0402
R8: library part RESISTOR_0402, "Generic SMD resistor, 0402", Manufacturer=Vishay, Manufacturer Part Number=CRCW0402100KFKED, Package=0402
R9: library part RESISTOR_0402, "Generic SMD resistor, 0402", Manufacturer=Vishay-Dale, Manufacturer Part Number=CRCW0402178KFKED, Package=0402
R10: library part RESISTOR_0402, "Generic SMD resistor, 0402", Manufacturer=Vishay-Dale, Manufacturer Part Number=CRCW0402732KFKED, Package=0402
R11: library part RESISTOR_0402, "Generic SMD resistor, 0402", Manufacturer="Vishay Dale", Manufacturer Part Number=CRCW0402169KFKED, Package=0402
R12 R13: library part RESISTOR_0402, "Generic SMD resistor, 0402", Manufacturer=Vishay-Dale, Manufacturer Part Number=CRCW040280K6FKED, Package=0402
R14: library part RESISTOR_0402, "Generic SMD resistor, 0402", Manufacturer=Vishay-Dale, Manufacturer Part Number=CRCW040232K4FKED, Package=0402
R15 R16 R17 R39 R54 R57 R58: library part RESISTOR_0603, "Generic SMD resistor, 0603", Manufacturer=Yageo, Manufacturer Part Number=RC0603FR-0710KL, Package=0603
R18 R19 R20 R21 R24 R25 R26 R27 R28 R29 R30 R31 R32 R41 R44 R45: library part RESISTOR_0603, "Generic SMD resistor, 0603", Manufacturer=Vishay, Manufacturer Part Number=CRCW0603100KFKEA, Package=0603
R22 R23: library part RESISTOR_0603, "Generic SMD resistor, 0603", Manufacturer=Vishay, Manufacturer Part Number=CRCW060322K0FKEA, Package=0603
R33 R34 R35 R36 R37 R38: library part RESISTOR_0603, "Generic SMD resistor, 0603", Manufacturer=Vishay, Manufacturer Part Number=CRCW060310K0FKEA, Package=0603
R40 R42 R53 R55 R63: library part RESISTOR_0603, "Generic SMD resistor, 0603", Manufacturer=Yageo, Manufacturer Part Number=RC0603FR-07100RL, Package=0603
R43: library part RESISTOR_0603, "Generic SMD resistor, 0603", Manufacturer=Vishay, Manufacturer Part Number=CRCW06031M00FKEA, Package=0603
R46 R47: library part RESISTOR_0603, "Generic SMD resistor, 0603", Manufacturer=Yageo, Manufacturer Part Number=RC0603FR-074K7L, Package=0603
R48 R49: library part RESISTOR_0603, "Generic SMD resistor, 0603", Manufacturer=Yageo, Manufacturer Part Number=RC0603JR-070RL, Package=0603
R50 R51: library part RESISTOR_0603, "Generic SMD resistor, 0603", Manufacturer=UNI-ROYAL, Manufacturer Part Number=0603WAF5101T5E, Package=0603
R56 R64: library part RESISTOR_0603, "Generic SMD resistor, 0603", Manufacturer=Yageo, Manufacturer Part Number=RC0603FR-07100KL, Package=0603
R59 R60: library part RESISTOR_0603, "Generic SMD resistor, 0603", Manufacturer=Yageo, Manufacturer Part Number=RC0603FR-073K3L, Package=0603
R61 R62: library part RESISTOR_0603, "Generic SMD resistor, 0603", Manufacturer=Yageo, Manufacturer Part Number=RC0603FR-075K1L, Package=0603
R_ANT_EXT1 R_ANT_PCB1: library part RESISTOR_0402, "Generic SMD resistor, 0402", Manufacturer=Yageo, Manufacturer Part Number=RC0402JR-070RL, Package=0402
SW1: "Description", Manufacturer_Name="C&K Components", Copyright="Copyright (C) 2026 Ultra Librarian. All rights reserved.", Manufacturer_Part_Number=PTS636SL43SMTRLFS, Type="Tactile Switches"
TP1 TP2 TP3 TP5 TP6 TP7 TP8 TP9 TP10 TP11 TP12 TP13 TP14 TP15 TP16 TP17 TP18 TP19 TP20 TP21 TP22 TP24 TP25 TP26 TP_SOX TP_SWK TP_VBK TP_VBS: library part "SMD Test Point RCT - 0C", "Natural PC Test Point - Plating Surface Mount Mounting Type", Manufacturer Part Number=RCT-0C
TP_GB TP_VBT TP_VSYS: library part RCT-0C, "Natural PC Test Point - - Plating Surface Mount Mounting Type", Package=None, Availability="In Stock", Check_prices=https://www.snapeda.com/parts/RCT-0C/TE+Connectivity/view-part/?ref=eda, MF="TE Connectivity AMP Connectors", MP=RCT-0C, Price=None, Purchase-URL=https://pricing.snapeda.com/search/part/RCT-0C/?ref=eda, SnapEDA_Link=https://www.snapeda.com/parts/RCT-0C/TE+Connectivity/view-part/?ref=snap
U1: "Standalone 1-cell 1.5-A linear battery charger, Power Path, 4.2-V VBAT, 10.5-V OVP and 4.4-V VOUT", Package="VQFN-16 Texas Instruments", Check_prices=https://www.snapeda.com/parts/BQ24074RGTR/Texas+Instruments/view-part/?ref=eda, MF="Texas Instruments", MP=BQ24074RGTR, SnapEDA_Link=https://www.snapeda.com/parts/BQ24074RGTR/Texas+Instruments/view-part/?ref=snap
U2: "8-A boost converter with 0.5-V ultra-low input voltage", Package="VQFN-HR-7 Texas Instruments", Availability="In Stock", Check_prices=https://www.snapeda.com/parts/TPS61022RWUR/Texas+Instruments/view-part/?ref=eda, MF="Texas Instruments", MP=TPS61022RWUR, Price=None, Purchase-URL=https://pricing.snapeda.com/search/part/TPS61022RWUR/?ref=eda, SnapEDA_Link=https://www.snapeda.com/parts/TPS61022RWUR/Texas+Instruments/view-part/?ref=snap
U3: "-20-V, P channel NexFETâ„¢ power MOSFET, single SON 3 mm x 3 mm, 6.5 mOhm", Package="VSON-CLIP-8 Texas Instruments", Availability="In Stock", Check_prices=https://www.snapeda.com/parts/CSD25404Q3/Texas+Instruments/view-part/?ref=eda, MF="Texas Instruments", MP=CSD25404Q3, Price=None, Purchase-URL=https://pricing.snapeda.com/search/part/CSD25404Q3/?ref=eda, SnapEDA_Link=https://www.snapeda.com/parts/CSD25404Q3/Texas+Instruments/view-part/?ref=snap
U4: "20-V, 10-A fully integrated sync boost with load disconnect 13-VQFN-HR -40 to 125", Manufacturer_Name="Texas Instruments", Copyright="Copyright (C) 2025 Ultra Librarian. All rights reserved.", Manufacturer_Part_Number=TPS61178RNWR, RefDes=RefDes, Type=TYPE
U5: "96% Buck-Boost Converter with 1.7A Current Switches, 3.3V fixed Output voltage in 3x3 QFN", Package="VSON-10 Texas Instruments", Check_prices=https://www.snapeda.com/parts/TPS63001DRCR/Texas+Instruments/view-part/?ref=eda, MF="Texas Instruments", MP=TPS63001DRCR, SnapEDA_Link=https://www.snapeda.com/parts/TPS63001DRCR/Texas+Instruments/view-part/?ref=snap
U6: "Ultra-low-power dual core Arm Cortex-M4 MCU 64 MHz, Cortex-M0+ 32 MHz with 1 Mbyte of Flash memory, Bluetooth LE 5.4, 802.15.4, Zigbee, Thread, Matter, USB, LCD, AES-256", Manufacturer_Name=STMicroelectronics, Copyright="Copyright (C) 2026 Ultra Librarian. All rights reserved.", Manufacturer_Part_Number=STM32WB55RGV6, RefDes=RefDes, Type=Type
U7: "2.4 GHz harmonic-rejection filter", Manufacturer_Name=TDK, Copyright="Copyright (C) 2025 Ultra Librarian. All rights reserved.", Manufacturer_Part_Number=DLF162500LT-5028A1, RefDes=RefDes, Type=Type
U8 U9 U12 U13 U14 U15: "Description", Manufacturer_Name="Diodes Inc", Copyright="Copyright (C) 2026 Ultra Librarian. All rights reserved.", Manufacturer_Part_Number=DMP3028LSD-13, RefDes=RefDes, Type=Type
U10 U11: "48-channel, 16-bit ESPWM LED driver with pre-charge FET, LOD Caterpillar and support 32-multiplexing 56-QFN -40 to 85", Manufacturer_Name="Texas Instruments", Copyright="Copyright (C) 2025 Ultra Librarian. All rights reserved.", Manufacturer_Part_Number=TLC59581RTQT, RefDes=RefDes, Type=Type
U16: "950 nm 60 mA Through Hole Reflective Optical Sensor with Transistor Output", Package=None, Availability=Unavailable, MP=TCRT5000, Price=None
U17: "Nanopower, small size comparator with push-pull output 5-SOT-23 -40 to 125", Manufacturer_Name="Texas Instruments", Copyright="Copyright (C) 2026 Ultra Librarian. All rights reserved.", Manufacturer_Part_Number=TLV7031DBVR, RefDes=RefDes, Type=TYPE
U18: "Accelerometer X, Y, Z Axis Â±2g, 4g, 8g, 16g 400Hz 12-LGA _2x2_", Package="LGA-12 STMicroelectronics", Availability=Unavailable, MF=STMicroelectronics, MP=LIS2DW12TR, Price=None, SnapEDA_Link=https://www.snapeda.com/parts/LIS2DW12TR/STMicroelectronics/view-part/621283/?ref=snap
U19: "single-channel capacitive touch detector", Package=None, Availability="Not in stock", Check_prices=https://www.snapeda.com/parts/TTP223-BA6/TONTEK/view-part/?ref=eda, MF=tontek, MP=TTP223-BA6, Price=None, SnapEDA_Link=https://www.snapeda.com/parts/TTP223-BA6/TONTEK/view-part/?ref=snap
U20: "40-V max, 8-A peak, sensorless FOC control 3-phase BLDC motor driver 40-VQFN -40 to 125", Manufacturer_Name="Texas Instruments", Copyright="Copyright (C) 2025 Ultra Librarian. All rights reserved.", Manufacturer_Part_Number=MCF8316A1VRGFR, RefDes=RefDes, Type=TYPE
X1: library part NX2012SA_32K768_6PF, "NDK 32.768 kHz tuning-fork crystal, 6 pF load capacitance, NX2012SA 2.0 × 1.2 mm package", Manufacturer=NDK, Manufacturer Part Number=MU00626-32.768K
X2: "32 MHz Crystal", Manufacturer_Name=NDK, Copyright="Copyright (C) 2025 Ultra Librarian. All rights reserved.", Manufacturer_Part_Number=NX2016SA-32MHZ-EXS00A-CS06654, RefDes=RefDes, Type=Crystals
X3: "Rotary Encoder Incremental 24 Quadrature (Incremental) Vertical", Manufacturer_Name="ALPS Electric", Mouser Part Number=688-EC12E24204A2, Datasheet Link=https://tech.alpsalpine.com/e/products/detail/EC12E24204A2/, Geometry.Height=15mm, Manufacturer_Part_Number=EC12E24204A2, Mouser Price/Stock=https://www.mouser.co.uk/ProductDetail/Alps-Alpine/EC12E24204A2?qs=m0BA540hBPdm3G3Lah9P1g%3D%3D

## Free pads (board coordinates)
  round 0.5 hole 0.5 unplated mask+0: 2(17.212,73.212) 2(17.212,73.847) 2(17.212,74.482) 2(17.235,62.543) 2(17.235,63.178) 2(17.235,63.813) 2(18.542,97.79) 2(18.542,98.425) 2(18.542,99.06) 2(18.542,184.658) 2(18.542,185.293) 2(18.542,185.928) 2(18.578,137.316) 2(18.578,137.951) 2(18.578,138.586) 2(18.736,73.212) 2(18.736,73.847) 2(18.736,74.482) 2(18.759,62.543) 2(18.759,63.178) 2(18.759,63.813) 2(20.066,97.79) 2(20.066,98.425) 2(20.066,99.06) 2(20.066,184.658) 2(20.066,185.293) 2(20.066,185.928) 2(20.102,137.316) 2(20.102,137.951) 2(20.102,138.586) 2(28.702,88.392) 2(28.702,89.916) 2(29.337,88.392) 2(29.337,89.916) 2(29.972,88.392) 2(29.972,89.916) 2(30.988,83.693) 2(30.988,85.217) 2(31.496,53.213) 2(31.496,54.737) 2(31.623,83.693) 2(31.623,85.217) 2(32.131,53.213) 2(32.131,54.737) 2(32.258,83.693) 2(32.258,85.217) 2(32.766,53.213) 2(32.766,54.737) 2(33.02,194.183) 2(33.02,195.707) 2(33.655,194.183) 2(33.655,195.707) 2(34.29,194.183) 2(34.29,195.707) 2(44.958,53.213) 2(44.958,54.737) 2(45.593,53.213) 2(45.593,54.737) 2(45.72,83.693) 2(45.72,85.217) 2(46.228,53.213) 2(46.228,54.737) 2(46.355,83.693) 2(46.355,85.217) 2(46.99,83.693) 2(46.99,85.217) 2(53.467,88.392) 2(53.467,89.916) 2(54.102,88.392) 2(54.102,89.916) 2(54.737,88.392) 2(54.737,89.916) 2(57.912,194.183) 2(57.912,195.707) 2(58.547,194.183) 2(58.547,195.707) 2(58.934,73.567) 2(58.934,74.202) 2(58.934,74.837) 2(58.944,63.553) 2(58.944,64.188) 2(58.944,64.823) 2(59.182,194.183) 2(59.182,195.707) 2(60.458,73.567) 2(60.458,74.202) 2(60.458,74.837) 2(60.468,63.553) 2(60.468,64.188) 2(60.468,64.823) 2(67.818,182.245) 2(67.818,182.88) 2(67.818,183.515) 2(67.854,137.697) 2(67.854,138.332) 2(67.854,138.967) 2(67.869,98.158) 2(67.869,98.793) 2(67.869,99.428) 2(69.342,182.245) 2(69.342,182.88) 2(69.342,183.515) 2(69.378,137.697) 2(69.378,138.332) 2(69.378,138.967) 2(69.393,98.158) 2(69.393,98.793) 2(69.393,99.428)
  round 0.5 hole 0.5 paste-2539.97 mask+0: 3(83.936,81.443) 3(83.979,82.266) 3(84.005,80.568) 3(85.374,82.214) 3(85.4,81.4) 3(85.435,80.533) 3(109.707,109.672) 3(109.726,55.291) 3(109.731,108.574) 3(109.814,56.355) 3(110.617,108.712) 3(110.619,109.758) 3(110.655,55.21) 3(110.657,56.256) 3(111.459,108.613) 3(111.543,56.394) 3(111.547,109.677) 3(111.566,55.296) 3(137.027,82.714) 3(137.066,80.985) 3(137.165,81.828) 3(138.125,82.737) 3(138.13,80.897) 3(138.211,81.826)
  round 2.2 hole 2.2 mask+0: 4(22.733,58.674) 4(22.733,80.264) 4(99.314,70.612) 4(117.983,102.997) 4(125.349,70.485)
  round 2.5 hole 2.5 mask+0: 4(55.499,58.674)

## Via types
v1: diameter 0.6, hole 0.3, Top Copper to Bottom Copper, 857 vias
v2: diameter 0.8, hole 0.4, Top Copper to Bottom Copper, 91 vias
v3: diameter 0.4, hole 0.2, Top Copper to Bottom Copper, 79 vias

## Nets (pads, with @x,y where several pads share a name; then routed paths per layer and width w, separated by ;. In a path a pad name is that pad's centre, name@x,y a point inside that pad or via, vN(x,y) a via of type N, cw(c..) or ccw(c..) an arc to the next point about the centre after c; other vN are vias at no path point)
5V_BASE: C5.2 J_BASE_LOWER.1 J_BASE_LOWER.2 J_BASE_LOWER.3 J_BASE_LOWER.4 R6.2 U2.3
  other v2: 47.752,77.724 49.784,77.724 45.72,79.248 47.752,79.248 49.784,79.248
5V_LED: B1.24 C43.2 C44.2 J_LED_BLADE1.1 J_LED_BLADE1.2 R18.2 R19.2 R20.2 R21.2 R24.2 R25.2 R26.2 R27.2 R28.2 R29.2 R30.2 R31.2 TP1.1 U8.1 U8.3 U9.1 U9.3 U12.1 U12.3 U13.1 U13.3 U14.1 U14.3 U15.1 U15.3 | length 129.6
  Top Copper w0.5: R18.2@25.097,110.288 R18.2@25.147,110.288 ; U8.1@25.527,112.827 25.527,111.263 25.297,111.033 25.297,110.438 R18.2@25.147,110.288 ; U8.3@28.067,112.827 28.087,112.807 R20.2@28.087,110.288 ; 28.631,109.813 28.156,110.288 28.056,110.288 27.647,109.879 27.647,109.722 27.413,109.488 26.181,109.488 25.531,110.138 25.297,110.138 R18.2@25.147,110.288 ; v1@30.39,109.347 30.39,109.357 30.399,109.366 30.409,109.366 31.081,110.038 31.081,110.138 31.231,110.288 R24.2@31.331,110.288 ; U12.1@31.877,112.827 31.877,110.834 R24.2@31.331,110.288 ; R26.2@34.373,110.288 34.379,110.288 35.329,109.338 36.068,109.338 36.707,109.338 37.581,110.212 R28.2@37.581,110.415 ; U12.3@34.417,112.827 34.388,112.797 34.388,110.346 R26.2@34.329,110.288 34.279,110.288 34.279,109.958 33.659,109.338 32.281,109.338 R24.2@31.331,110.288 ; v2(37.211,117.221) 37.211,117.14 36.957,116.886 36.957,112.395 ; U14.1@38.227,112.953 38.203,112.928 37.49,112.928 36.957,112.395 ; U14.3@40.767,112.953 40.767,112.66 40.552,112.445 R30.2@40.552,110.415 ; U9.1@44.323,112.954 44.323,112.661 43.854,112.192 R19.2@43.854,110.415 ; U9.3@46.863,112.954 R21.2@46.863,110.415 ; U13.1@50.419,112.954 50.419,112.661 50.077,112.319 50.077,111.125 ; U13.3@52.959,112.954 52.979,112.934 R27.2@52.979,110.415 ; R29.2@56.046,110.415 56.096,110.415 57.046,109.465 58.424,109.465 58.878,109.919 58.878,110.415 R31.2@58.928,110.415 58.928,112.015 58.934,112.021 58.934,112.706 U15.3@59.055,112.827 ; v2(56.261,114.3) 56.261,114.219 56.486,113.994 56.486,112.856 U15.1@56.515,112.827 56.515,111.252 55.698,110.435 55.698,109.787 55.376,109.465 53.998,109.465 53.048,110.415 R27.2@52.998,110.415 52.948,110.365 52.948,109.958 52.455,109.465 51.077,109.465 50.127,110.415 R25.2@50.077,110.415 50.077,111.125 ; 36.957,112.395 36.957,111.039 R28.2@37.581,110.415 ; R28.2@37.581,110.415 R28.2@37.631,110.415 ; R28.2@37.581,110.415 R28.2@37.631,110.415 ; R28.2@37.631,110.415 37.681,110.415 38.631,109.465 40.009,109.465 40.502,109.958 40.502,110.415 R30.2@40.552,110.415 ; R30.2@40.552,110.415 40.602,110.415 41.552,109.465 42.93,109.465 43.804,110.339 43.804,110.415 R19.2@43.854,110.415 ; R19.2@43.854,110.415 43.904,110.415 44.854,109.465 46.232,109.465 46.813,110.046 46.813,110.365 R21.2@46.863,110.415 ; R21.2@46.863,110.415 46.913,110.415 47.863,109.465 49.241,109.465 49.563,109.787 49.563,110.611 50.077,111.125
  Top Copper w0.6: 28.631,109.813 v1(29.106,109.338) ; 36.068,103.566 36.068,109.338
  Top Copper w0.8: TP1.1@32.639,97.155 33.039,97.155 33.464,97.58 33.464,98.014 33.98,98.53 34.243,98.53 36.068,100.355 36.068,103.566 ; R31.2@58.928,110.415 R31.2@58.978,110.415
  Bottom Copper w0.3: C44.2@37.211,118.676 37.347,118.54 37.369,118.54 37.643,118.266 38.393,118.266 38.468,118.191 B1.24@38.468,117.678
  Bottom Copper w0.5: v2(37.211,117.221) C44.2@37.211,118.697
  Bottom Copper w0.8: C43.2@52.07,120.97 53.735,120.97 v2(53.771,120.934) 53.867,120.838 53.988,120.838 56.642,118.184 56.642,114.681 v2(56.261,114.3)
  Bottom Copper w1: v1(29.106,109.338) 29.115,109.347 v1(30.353,109.347) 32.133,107.567 32.133,100.567 30.861,99.295 J_LED_BLADE1.2@30.861,94.615 J_LED_BLADE1.1@30.861,92.075
5V_ROT: C9.2 C10.2 C11.2 C17.2 J_LED_CTRL1.1 J_LED_CTRL1.2 J_ROT_LOWER.1 J_ROT_LOWER.2 J_ROT_LOWER.3 J_ROT_LOWER.4 L2.1 U4.11 U4.12 U5.5 U5.6 U5.8 | length 35.8
  Top Copper w0.3: U5.8@83.182,165.674 81.28,165.674 81.28,166.944 81.915,167.579 82.677,167.579 ; U5.6@83.182,166.674 82.853,166.674 82.677,166.849 82.677,167.579 ; C17.2@85.913,168.595 85.413,169.095 85.413,169.62 84.914,170.119 82.853,170.119 82.677,169.943 82.677,167.579 ; U4.12@97.29,164.837 97.29,168.817 C9.2@97.744,169.272
  L3_PWR_SIG w0.5: 81.28,165.674 81.28,167.579 83.82,170.119 v1(85.471,170.119) v1(86.487,170.119)
  L3_PWR_SIG w1: v2(90.805,161.671) v2(90.805,162.687) v2(90.805,163.703) v2(90.805,164.719) 95.123,169.037 v2(96.266,169.037)
+3V3_LED: C39.2 C40.2 C41.2 C42.2 J_LED_BLADE1.4 J_LED_BLADE1.20 J_LED_TOP_SLIP1.03 R32.2 TP3.1 U10.43 U11.43 | length 189.9
  Top Copper w0.3: U11.43@31.913,100.026 32.901,100.026 33.078,100.203 C41.2@33.099,100.203 ; C42.2@33.099,101.346 C41.2@33.099,100.203 ; C41.2@33.123,100.179 C41.2@33.099,100.203
  Top Copper w0.4: J_LED_BLADE1.20@53.721,94.615 55.118,94.615 55.448,94.945 55.448,94.95 55.653,95.155 55.658,95.155 56.007,95.504 56.007,99.424 56.241,99.658 59.012,99.658 60.296,100.942 60.296,106.651 v1(61.976,108.331)
  Top Copper w0.5: C41.2@33.123,100.179 33.128,100.175 33.128,99.079 v1(33.147,99.06) 33.128,99.041 33.128,98.96 32.548,98.38 30.986,98.38 30.693,98.087 30.693,97.73 TP3.1@30.118,97.155 ; v2(44.958,116.078) 45.015,116.135 46.034,116.135 46.358,116.459 58.613,116.459 61.976,113.096 v1(61.976,108.331) ; J_LED_BLADE1.20@53.721,94.615 52.559,93.453 52.559,91.421 52.051,90.913 38,90.913 37.854,91.059 36.568,91.059 36.422,90.913 35.46,90.913 34.671,91.702 34.671,93.345 J_LED_BLADE1.4@33.401,94.615 33.358,94.615 32.596,95.377 31.742,95.377 30.693,96.426 30.693,96.58 TP3.1@30.118,97.155 ; TP3.1@30.118,97.155 TP3.1@29.718,97.155 TP3.1@30.118,97.155
  L3_PWR_SIG w0.3: v2(44.958,116.078) 44.958,116.963 44.843,117.078 44.843,122.068 45.085,122.31 45.085,190.744 45.523,191.182 61.869,191.182 62.045,191.006 62.045,188.648 61.223,187.826 61.223,184.395 62.23,183.388 64.897,183.388 65.163,183.654 65.163,184.543 J_LED_TOP_SLIP1.03@65.278,184.658
  Bottom Copper w0.3: U10.43@60.768,106.388 61.529,106.387 61.606,106.465 61.801,106.465 61.937,106.601 C40.2@61.958,106.601 61.983,106.626 61.983,107.544 C39.2@62.008,107.569 61.992,107.585 61.992,108.315 v1(61.976,108.331)
  Bottom Copper w0.8: R32.2@44.069,116.039 44.069,116.078 v2(44.958,116.078)
+3V3_ROT: C18.2 C20.2 C21.2 C22.2 C23.2 C24.2 C25.2 C26.2 C27.2 C28.2 C29.2 C32.2 C33.2 C45.1 C46.1 C47.2 C48.2 J3.1 J_LED_CTRL1.4 R15.2 R16.2 R38.1 R39.2 R40.1 R44.1 R46.2 R47.2 R48.2 R49.1 R59.1 R60.1 R61.2 R62.2 TP5.1 U5.1 U5.10 U6.1 U6.13 U6.14 U6.30 U6.33 U6.44 U6.45 U6.55 U6.68 U17.5 U18.9 U18.10 | length 186.1
  Top Copper w0.2: v1(102.623,139.696) 102.623,139.693 102.999,139.317 103.163,139.153 103.163,138.82 C21.2@103.299,138.684 103.454,138.529 103.906,138.529 104.085,138.35 104.427,138.35 104.55,138.227 U6.30@105.296,138.227 ; C27.2@103.299,136.017 C26.2@103.299,137.16 104.132,137.16 104.242,137.05 105.273,137.05 U6.33@105.296,137.027 ; C25.2@106.108,145.666 106.294,145.48 106.316,145.48 107.22,144.576 U6.14@107.22,143.751 ; C24.2@107.188,145.648 107.62,145.216 U6.13@107.62,143.751 ; C28.2@109.474,133.525 109.597,133.648 109.597,135.88 U6.44@109.62,135.903 ; U6.45@110.02,135.903 110.043,135.88 110.043,135.252 110.675,134.62 C29.2@110.696,134.62 ; U6.1@112.42,143.751 113.675,143.751 113.792,143.868 C33.2@113.792,144.78 ; U6.55@113.144,137.827 113.96,137.827 113.992,137.795 C32.2@114.681,137.795 v1(114.681,136.779) ; U6.68@113.144,143.027 U6.68@113.474,143.027 ; C23.2@114.887,143.637 114.866,143.637 114.085,143.637 U6.68@113.474,143.027 ; C20.2@115.014,142.494 114.998,142.494 114.812,142.68 114.812,142.91 114.695,143.027 U6.68@113.474,143.027
  Top Copper w0.3: U18.9@95.627,147.449 U18.10@96.127,147.449 ; C46.1@96.012,146.05 96.102,146.14 96.102,147.424 U18.10@96.127,147.449 ; C25.2@106.108,145.666 C25.2@106.108,145.688 106.108,145.709 105.972,145.845 104.98,145.845 104.044,146.781 101.053,146.781 100.957,146.685 99.568,146.685 v1(97.409,146.685) 97.409,146.725 96.685,147.449 U18.10@96.127,147.449 ; R16.2@109.728,151.98 v1(110.807,151.98) 111.887,151.98 111.926,152.019 v1(112.903,152.019) 112.946,152.019 113.455,152.528 115.503,152.528 115.679,152.352 115.679,146.794 v1(114.554,145.669) 114.531,145.669 114.228,145.366 114.217,145.366 113.95,145.099 113.95,144.916 113.928,144.895 C33.2@113.792,144.895 ; C22.2@110.617,133.503 110.753,133.367 111.149,133.367 111.616,132.899 111.957,132.899 v1(112.014,132.842) 114.243,135.071 114.624,135.071 v1(114.681,135.128) 116.586,135.128 v1(119.38,137.922) 120.709,139.251 120.794,139.251 121.115,139.573 J3.1@121.412,139.573 TP5.1@125.73,139.573 ; C33.2@113.792,144.78 113.813,144.78 113.95,144.644 113.95,144.241 114.173,144.018 114.485,144.018 C23.2@114.866,143.637
  Top Copper w0.35: R46.2@93.345,151.106 93.57,151.331 94.27,151.331 R49.1@94.742,151.803 ; R49.1@94.895,151.739 94.895,151.762 94.967,151.834 95.716,151.834 R48.2@95.912,151.638 ; R48.2@95.885,151.764 96.11,151.539 96.757,151.539 97.409,150.887 R47.2@97.409,150.837 98.845,150.837 99.568,150.114 99.568,146.685 ; C25.2@106.117,145.678 107.179,145.678 C24.2@107.188,145.669 ; C28.2@109.474,133.525 C22.2@110.617,133.525 110.657,133.564 110.657,134.58 C29.2@110.696,134.62
  Top Copper w0.381: R40.1@81.661,137.414 v1(82.716,137.414) R39.2@83.771,137.414 83.821,137.414 84.03,137.624 84.03,137.674 84.337,137.98 84.337,141.233 84.709,141.605 88.423,141.605 88.646,141.828 88.646,146.216 ; R44.1@87.757,146.216 88.646,146.216 ; R38.1@91.401,143.002 R38.1@91.451,143.002 ; C48.2@96.107,143.256 96.086,143.256 95.99,143.16 95.99,142.921 95.436,142.367 95.064,142.367 94.429,143.002 C45.1@93.599,143.002 v1(92.329,143.002) R38.1@91.451,143.002 ; 88.646,146.216 90.528,146.216 91.562,145.182 U17.5@91.562,144.907 91.562,143.113 R38.1@91.451,143.002
  Top Copper w0.5: R46.2@93.345,151.091 R46.2@93.345,151.106 ; C48.2@96.107,143.256 C47.2@96.107,144.399 ; C27.2@103.299,136.017 v1(104.394,136.017) ; R61.2@117.538,181.761 117.622,181.845 118.32,181.845 v1(118.339,181.864)
  Top Copper w0.6: 86.487,160.147 86.487,154.94 87.757,153.67 90.835,153.67 91.186,154.021 91.186,156.06 92.456,157.33 J_LED_CTRL1.4@92.456,157.48 93.853,156.083 93.853,155.421 93.848,155.416 93.848,154.156 93.345,153.653 R46.2@93.345,151.241 ; C46.1@96.012,146.05 96.099,145.963 96.099,144.407 C47.2@96.107,144.399
  Top Copper w0.9: v1(82.677,163.642) 82.677,160.782 83.312,160.147 86.04,160.147 v1(86.487,160.594) ; C18.2@86.421,162.245 C18.2@86.487,162.179
  L3_PWR_SIG w0.3: v1(104.394,136.017) 104.394,137.925 v1(102.623,139.696) 103.288,140.361 103.288,144.522 104.395,145.629 105.116,145.629 110.75,151.263 110.75,151.923 v1(110.807,151.98)
  L3_PWR_SIG w0.4: v1(114.554,145.669) 114.554,142.438 114.904,142.088 114.904,140.761 114.906,140.76 114.906,138.909 114.681,138.684 v1(114.681,136.779)
  L3_PWR_SIG w0.5: v1(118.339,181.864) 118.367,181.864 120.462,179.768 v1(126.301,179.768)
  Bottom Copper w0.4: v1(114.681,135.128) v1(114.681,136.779)
  other v1: 105.156,145.669
+3V3_TOP: C50.2 C51.2 J_LED_TOP_SLIP2.03 U19.5 | length 22.3
  Top Copper w0.3: C51.2@96.266,91.789 C50.2@97.282,91.789 97.282,91.811 96.626,92.467 95.782,92.467 94.169,94.08 94.169,95.228 94.345,95.404 95.193,95.404 95.612,95.822 95.612,96.599 96.03,97.017 96.888,97.017 97.064,96.842 97.064,96.758 U19.5@97.409,96.413
  Top Copper w0.4: U19.5@97.409,96.146 97.409,96.413 97.409,97.79 99.06,99.441 103.685,99.441 104.955,100.711 J_LED_TOP_SLIP2.03@105.918,100.711
AGND: C56.2 C_bk1.1 J8.2 U20.4 U20.26 U20.41 | length 21.3
  Top Copper w0.2: U20.26@123.052,173.828 123.706,173.828 123.823,173.71 123.823,172.811 124.474,172.16 C56.2@124.523,172.16 C56.2@124.535,172.148
  Top Copper w0.25: v1(114.681,175.768) 114.728,175.721 115.356,175.721 115.626,175.452 117.368,175.452 117.492,175.328 U20.4@118.145,175.328 U20.41@119.349,175.328
  Top Copper w0.3: U20.41@120.598,174.078 120.848,173.828 U20.26@123.052,173.828
  Top Copper w0.5: J8.2@128.969,172.148 J8.2@129.095,172.022
  Top Copper w0.6: C56.2@124.535,172.148 126.174,172.148
  Top Copper w0.7: 126.174,172.148 J8.2@128.969,172.148
  Top Copper w1: C_bk1.1@113.411,180.697 113.435,180.721 v1(114.947,180.721)
  L2_GND w0.5: v1(114.681,175.768) 114.681,180.428 114.947,180.694 v1(114.947,180.721)
  other v3: 119.998,171.478 121.099,171.478 118.998,172.478 119.998,172.478 121.099,172.478 122.198,172.478 118.998,173.478 119.998,173.478 121.099,173.478 122.198,173.478 118.998,174.778 119.998,174.778 121.198,174.778 122.198,174.778 118.998,175.778 119.998,175.778 121.198,175.778 122.198,175.778 119.998,176.678 121.198,176.678
ANT_50OHM: R_ANT_EXT1.1 R_ANT_PCB1.1 U7.3 | length 2.9
  Top Copper w0.3: R_ANT_PCB1.1@98.087,134.493 R_ANT_EXT1.1@98.087,135.763 ; R_ANT_EXT1.1@98.087,135.713 98.187,135.613 98.308,135.613 98.43,135.613 98.686,135.357 U7.3@99.568,135.357
ANT_EXT_PATH: J4.1 R_ANT_EXT1.2 | length 3
  Top Copper w0.35: R_ANT_EXT1.2@97.087,135.763 97.079,135.771 97.079,138.001 J4.1@97.621,138.543
ANT_PCB_PATH: C37_DNP.1 L7.1 R_ANT_PCB1.2 | length 5.4
  Top Copper w0.25: R_ANT_PCB1.2@97.087,134.62 97.087,131.907 97.841,131.153 97.841,131 97.995,130.846 98.056,130.846 98.219,130.683 C37_DNP.1@99.19,130.683
AVDD: C56.1 R54.2 R58.1 U20.27 | length 16.2
  Top Copper w0.25: U20.27@123.052,174.328 123.055,174.324 123.81,174.324 124.474,173.661 C56.1@124.523,173.661 ; v1(123.063,182.88) 123.063,181.825 R58.1@123.126,181.761
  Top Copper w0.5: C56.1@124.573,173.661 124.943,173.291 R54.2@126.936,173.291